# Altium PCB PCB_7000_0303_Rev13.PcbDoc (part 1 of 3)
Units mil, origin at the board's own origin, x right, y up, seen from the top; angles counter-clockwise.
Board outline 6252 x 3995 mil, 4 copper layers (Top Layer, Power, GND, Bottom Layer), stack 62.449 mil thick; 124 components, 105 nets, 610 pads, 262 vias.
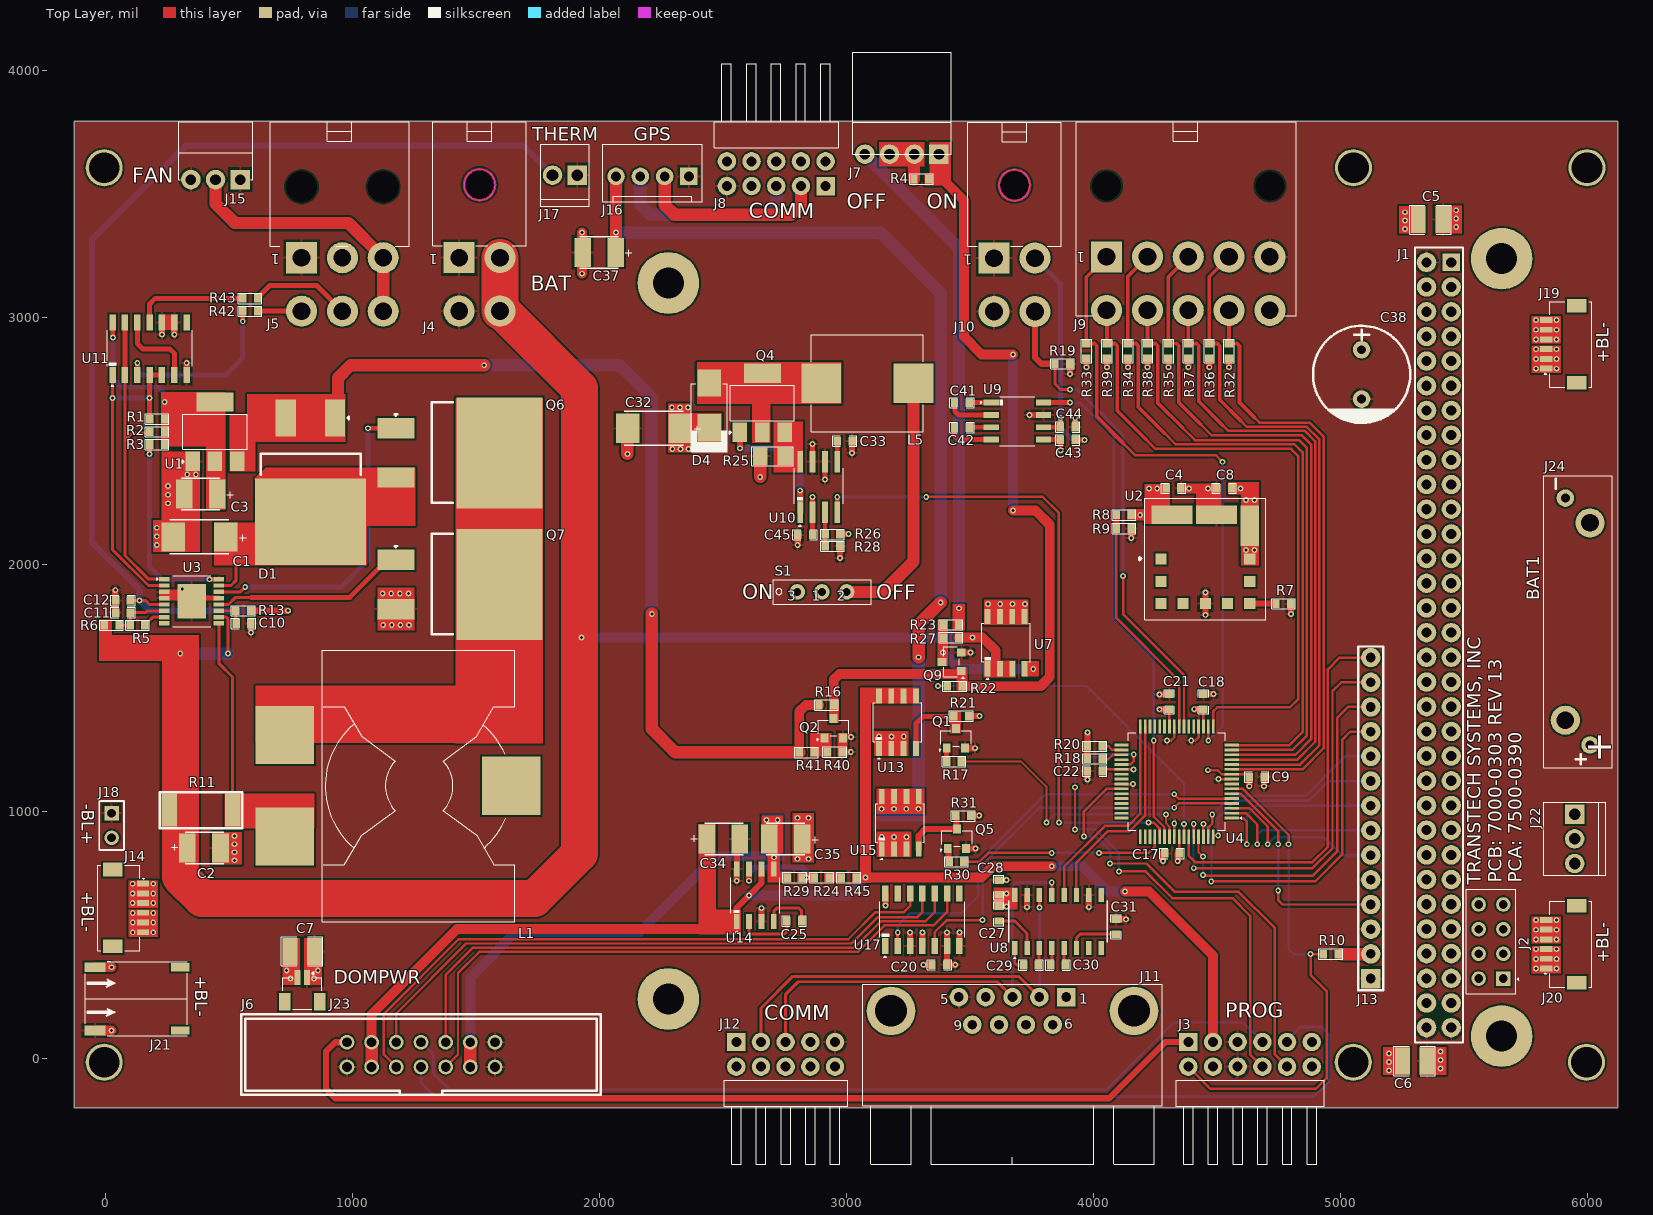
[diagram p0: Top Layer view]
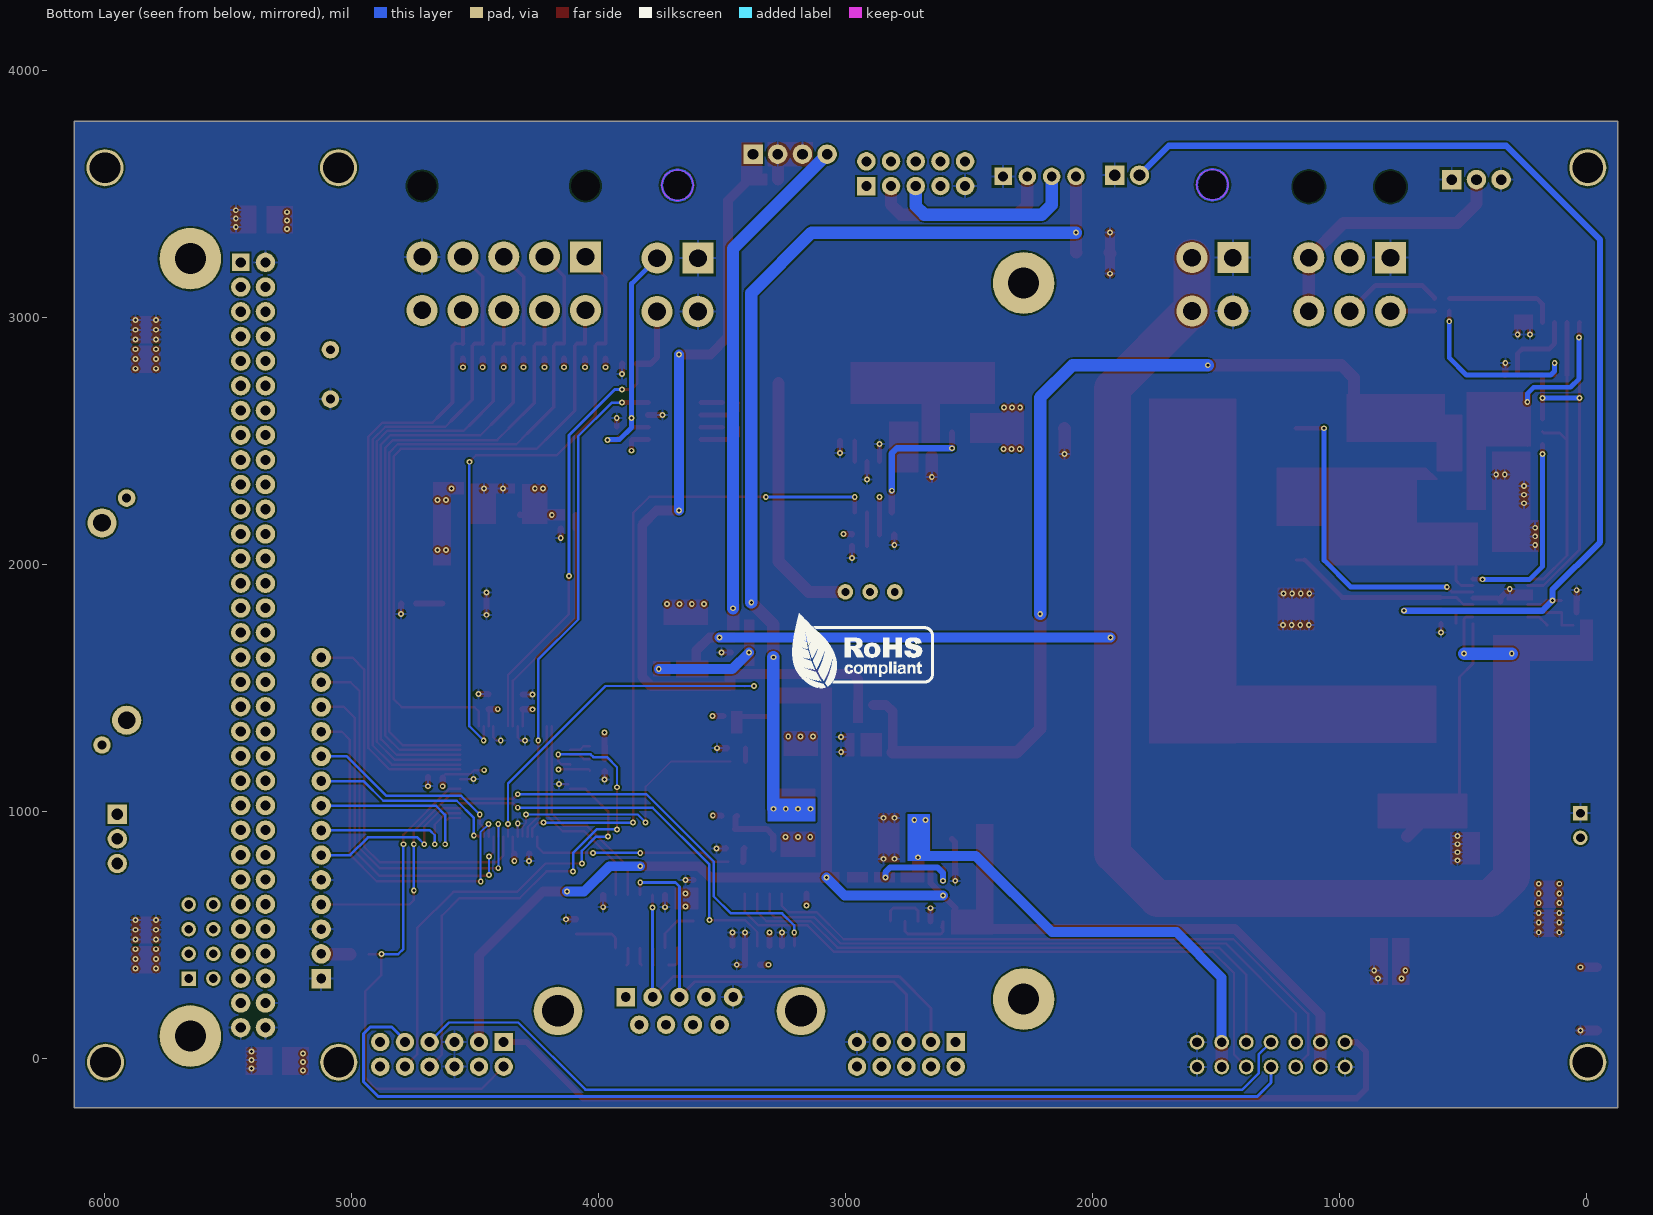
[diagram p1: Bottom Layer view, seen from below]
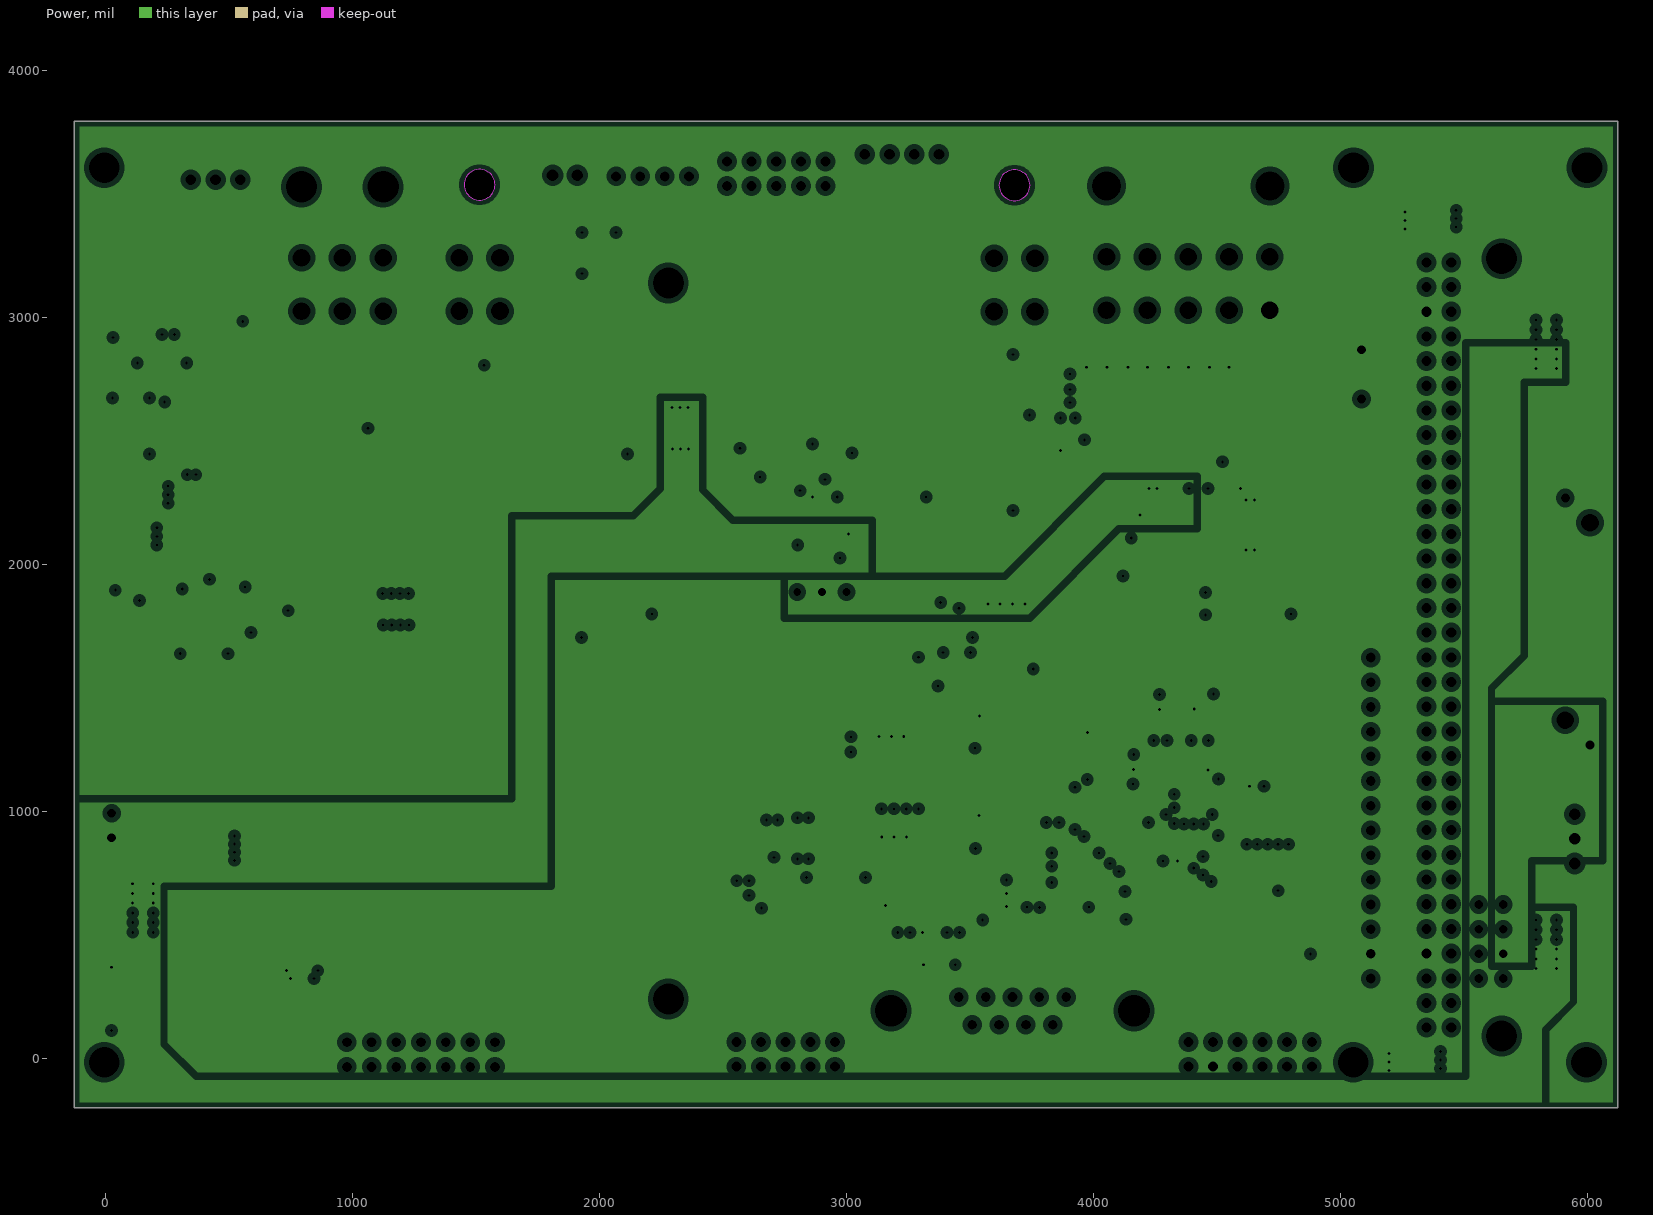
[diagram p2: Power, clearances drawn from the general rule]
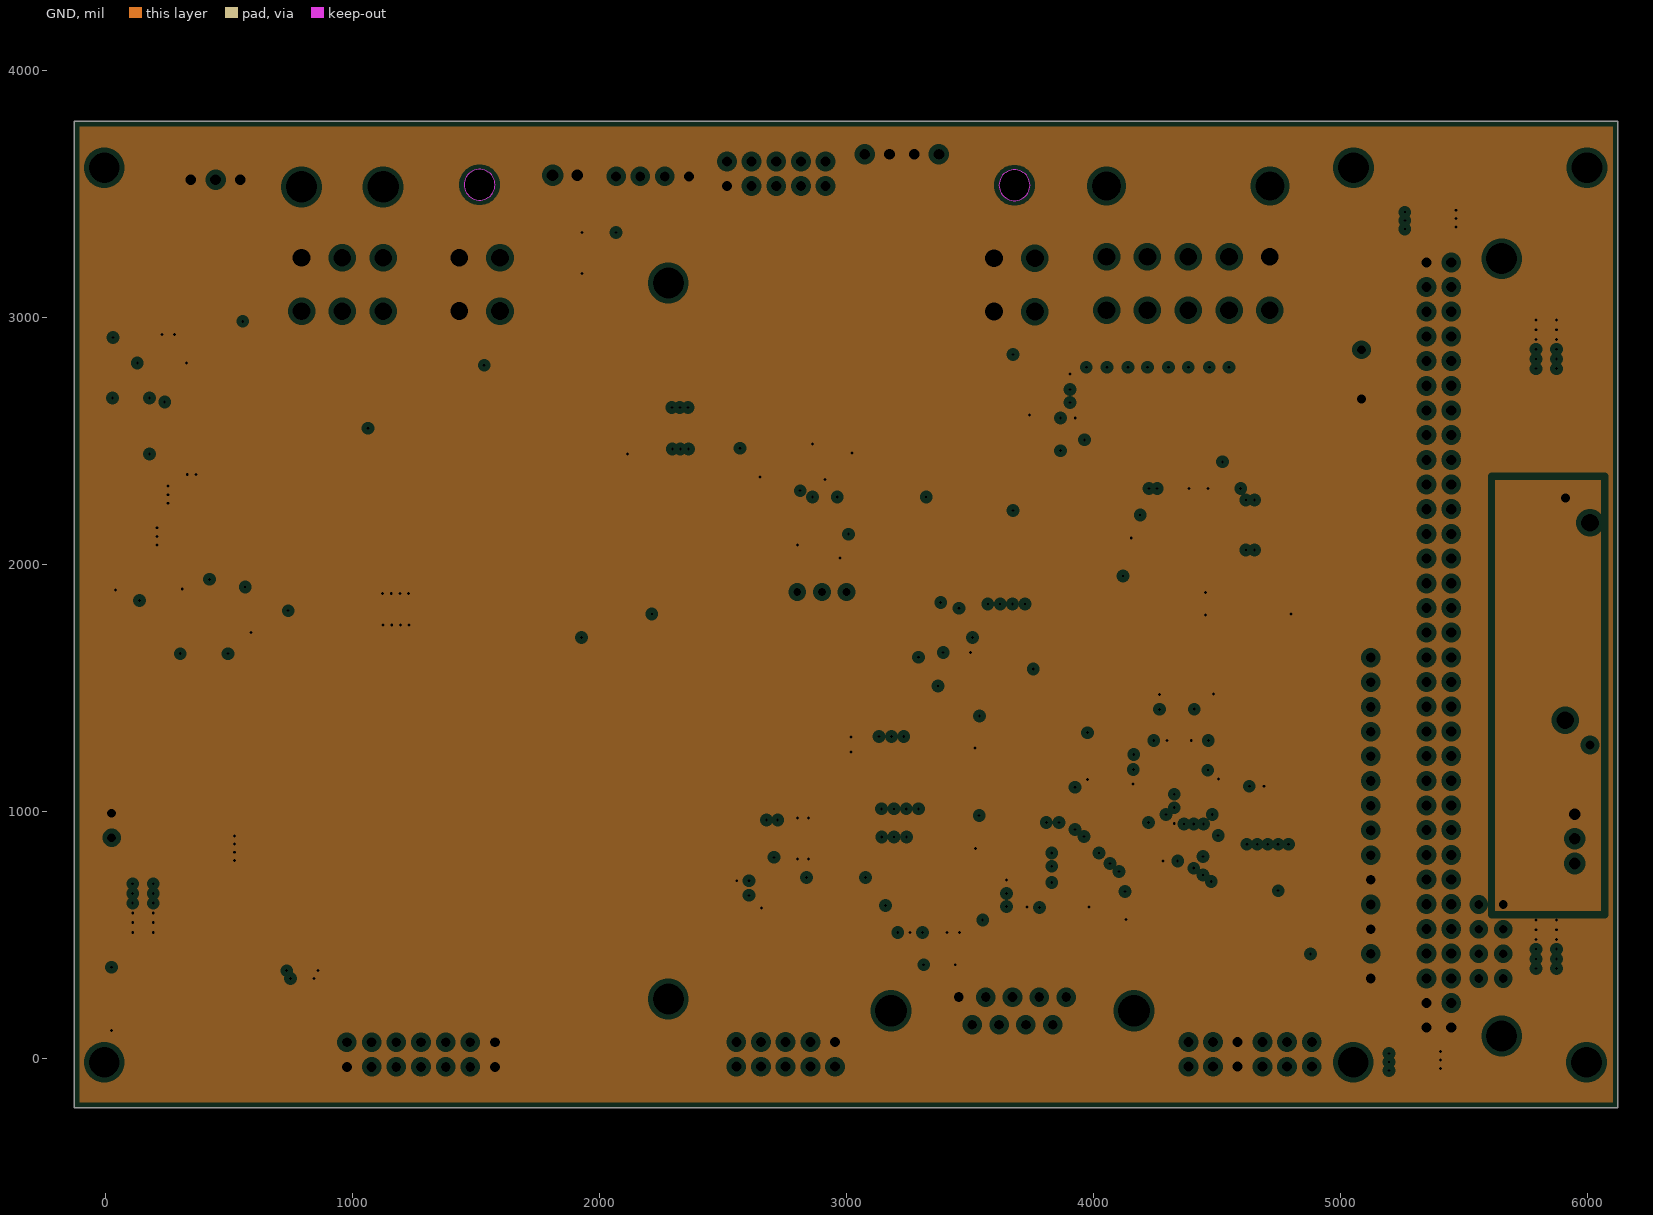
[diagram p3: GND, clearances drawn from the general rule]
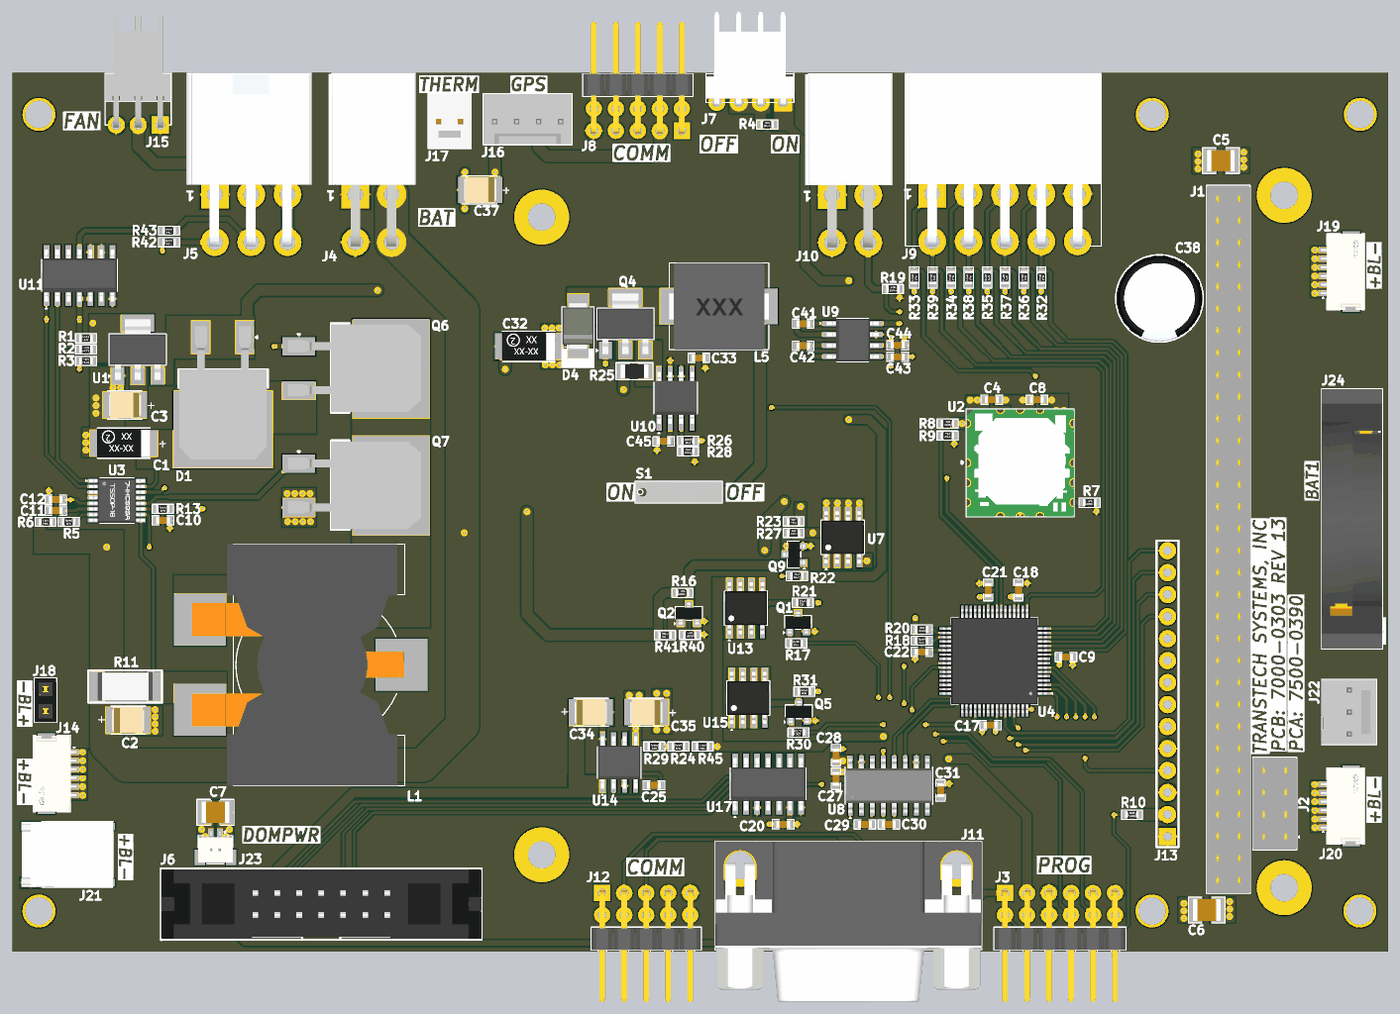
[diagram p5: 3D render of the assembled board from above, using the file's embedded part models]

## Layer stack, top to bottom
Top Solder: solder mask 0.3937, Solder Resist, Dk 3.5
Top Layer: signal copper 1.378
Dielectric 2: prepreg 8.2835, PP-006, Dk 4.1
Power: plane copper 0.5984, net (Multiple Nets)
Core: core 41.9291, FR-4, Dk 4.8
GND: plane copper 0.5984, net (Multiple Nets)
Dielectric 3: prepreg 8.2835, PP-006, Dk 4.1
Bottom Layer: signal copper 1.378
Bottom Solder: solder mask 0.3937, Solder Resist, Dk 3.5

## Board outline
-127,-200 -127,3795 6125,3795 6125,-200

## Design rules (kind name [scope] priority, off if disabled: settings)
Clearance [All] p1: gap=7 ignorepadtopadclearanceinfootprint=FALSE except(4: Arc-SMDPad Track-SMDPad SMDPad-SMDPad)
Height [All] p1: minheight=0 maxheight=10000 prefheight=500
HoleSize [All] p1: absolutevalues=TRUE maxlimit=1000 minlimit=1 maxpercent=80.000 minpercent=20.000
HoleToHoleClearance [All] p1: gap=0 allowstackedmicrovias=TRUE
MinimumSolderMaskSliver [All] p1: minsoldermaskwidth=0
PlaneClearance [All] p1: clearance=20
PlaneConnect [All] p1: planeconnectstyle=Direct reliefexpansion=20 reliefentries=4 reliefconductorwidth=10 reliefairgap=10
PolygonConnect [All] p1: connectstyle=Relief reliefconductorwidth=10 reliefentries=4 polygonreliefangle="90 Angle" airgapwidth=10
RoutingVias [All] p1: holewidth=11.81 width=23.62 viastyle="Through Hole" minholewidth=11.81 minwidth=23.62 maxholewidth=11.81 maxwidth=23.62
SilkToSilkClearance [All] p1: silktosilkclearance=0
SilkToSolderMaskClearance [IsPad] p1: minsilkscreentomaskgap=0 clearancetoexposedcopper=TRUE
SolderMaskExpansion [All] p1: expansion=4 istentingtop=FALSE
UnRoutedNet [All] p1: checkbadconnections=TRUE
Width [All] p1: maxlimit=150 minlimit=8 preferedwidth=15 minimp=50.000000 maximp=50.000000 favimp=50.000000
21 further rules are at their usual default settings.

## Classes and differential pairs
component class U_Power-Sheet: C1 C2 C3 C4 C8 C10 C11 C12 C25 C32 C33 C34 C35 C37 C41 C42 C43 C44 C45 D1 D4 J4 J7 J8 J10 J14 J16 J17 J18 J19 J20 J21 L1 L5 Q1 Q4 Q5 Q6 Q7 Q9 R4 R5 R6 R7 R8 R9 R11 R13 R17 R19 R21 R22 R23 R24 R25 R26 R27 R28 R29 R30 R31 R45 S1 U1 U2 U3 U7 U9 U10 U13 U14 U15
component class U_Controller-Sheet: C5 C6 C7 C9 C17 C18 C20 C21 C22 C27 C28 C29 C30 C31 C38 J1 J2 J3 J5 J6 J9 J11 J12 J13 J15 J22 J23 J24 Q2 R1 R2 R3 R10 R16 R18 R20 R32 R33 R34 R35 R36 R37 R38 R39 R40 R41 R42 R43 U4 U8 U11 U17

## Components (designator, comment, footprint, x,y, rotation, side; value= is the part's Value field where it differs from the comment)
C1 "22uF" Case-C 380,2112 r180 top locked
C2 "10uF" Case-B 398.07,852 r0 top locked
C3 "10uF" Case-B 385,2285 r180 top locked
C4 "4.7uF" Cap-0603 4325,2309 r180 top locked
C5 "100uF" Cap-1210 5366,3397 r0 top locked
C6 "100uF" Cap-1210 5302,-11 r0 top locked
C7 "100uF" Cap-1210 796,433 r180 top locked
C8 "4.7uF" Cap-0603 4530,2309 r0 top locked
C9 "0.1uF" Cap-0603 4662,1139 r180 top locked
C10 "0.1uF" Cap-0603 558,1761 r180 top locked
C11 "33nF" Cap-0603 70,1805 r180 top locked
C12 "68nF" Cap-0603 70,1855 r0 top locked
C17 "0.1uF" Cap-0603 4319,830 r0 top locked
C18 "0.1uF" Cap-0603 4446,1444 r270 top locked
C20 "0.1uF" Cap-0603 3377,379 r180 top locked
C21 "0.1uF" Cap-0603 4308,1444 r270 top locked
C22 "0.1uF" Cap-0603 4006,1163 r0 top locked
C25 "4.7uF" Cap-0603 2789,556 r0 top locked
C27 "0.1uF" Cap-0603 3617,586 r90 top locked
C28 "0.1uF" Cap-0603 3617,692 r270 top locked
C29 "0.1uF" Cap-0603 3748,378 r180 top locked
C30 "0.1uF" Cap-0603 3857,378 r0 top locked
C31 "0.1uF" Cap-0603 4092,533 r270 top locked
C32 "10uF" Case-C 2220.7,2552 r180 top locked
C33 "0.1uF" Cap-0603 2993,2500 r180 top locked
C34 "22uF" Case-B 2502,888 r0 top locked
C35 "22uF" Case-B 2755,888 r180 top locked
C37 "22uF" Case-B 1999,3264 r180 top
C38 "6ME3300WG" 6ME3300WG 5087,2770 r270 top locked
C41 "220nF" Cap-0603 3468,2655 r0 top locked
C42 "220nF" Cap-0603 3468,2555 r0 top locked
C43 "0.1uF" Cap-0603 3897,2505 r180 top locked
C44 "4.7uF" Cap-0603 3897,2557 r180 top locked
C45 "0.1uF" Cap-0603 2832.75,2120.32 r180 top locked
D1 "VS-48CTQ060S-M3" VS-48CTQ060S-M3 829,2384 r180 top locked
D4 "STPS340U" SMB_ 2444,2644.55 r270 top locked
J1 "ESW-132-12-G-D" ESW-132-12-G-D 5400,1674 r90 top locked
J2 "ESW-104-12-G-D" "HDR 2x4 Female Header" 5611,473 r90 top locked
J3 "CS-1107-2X6(L14/19)" "HDR 2x6TH (rigth angle)" 4635,16 r0 top locked
J4 "0039300040" 0039300040 1514.32,3134.73 r180 top locked
J5 "0039301060" 0039301060 958.64,3278.03 r180 top locked
J6 "2.54-2*7P" 2.54-2*7P 1277,15 r0 top locked
J7 "0022053041" 0022053041 3225,3662 r180 top locked
J8 "2541WR-2x05P" "HDR 2x5TH (rigth angle)" 2716,3583 r180 top locked
J9 "0039301100" 0039301100 4054,3246 r180 top locked
J10 "0039300040" 0039300040 3681,3132.73 r180 top locked
J11 "D-DMR009PF-D002" D-DMR009PF-D002 3672.88,191.99 r180 top locked
J12 "2541WR-2x05P" "HDR 2x5TH (rigth angle)" 2754,16 r0 top locked
J13 "DNP" "14P Through Hole Pads_" 5124,973 r90 top locked
J14 "SM06B-SHLS-TF(LF)(SN)" SM06B-SHLS-TF(LF)(SN) 89.48,609.06 r270 top locked
J15 "0022053031" 0022053031 445,3559 r180 top locked
J16 "M2510V-04P" M2510V-04P 2214.79,3572 r180 top locked
J17 "0022112022" 0022112022 1860,3577 r180 top locked
J18 "DM254R-11-02-85" "HDR1X2 (Female)" 24,943 r270 top locked
J19 "SM06B-SHLS-TF(LF)(SN)" SM06B-SHLS-TF(LF)(SN) 5896,2892 r90 top locked
J20 "SM06B-SHLS-TF(LF)(SN)" SM06B-SHLS-TF(LF)(SN) 5896,462 r90 top locked
J21 "SM02B-BHSS-1-TB(LF)(SN)" SM02B-BHSS-1-TB(LF)(SN) 129,241 r180 top locked
J22 "0022112032" 0022112032 5950,889 r270 top locked
J23 "BM02B-SRSS-TB(LF)(SN)" BM02B-SRSS-TB(LF)(SN) 796,278 r0 top locked
J24 "NH5077-LF" NH5077-LF 5962,1769 r90 top locked
L1 "THC2818-4R7M" THC2818-4R7M 1184,1104 r270 top locked
L5 "47uH" SMMS1050-470M 3085.01,2734 r0 top locked
Q1 "MMBT2222A-7-F" SOT-23 3444,1295.63 r0 top locked
Q2 "MMBT2222A-7-F" SOT-23 2948,1337 r0 top locked
Q4 "NTF3055L175T1G-VB" "SOT- 223" 2659.45,2655.08 r0 top locked
Q5 "MMBT2222A-7-F" SOT-23 3448,890 r0 top locked
Q6 "FQB27P06TM" D2Pak. 1385.04,2452 r270 top locked
Q7 "STB55NF06T4" STB55NF06T4 1385,1919 r270 top locked
Q9 "MMBT2222A-7-F" SOT-23 3426,1606 r90 top locked
R1 "10K" Res-0603 208,2589 r0 top locked value=10kR
R2 "10K" Res-0603 208,2538 r180 top locked value=10kR
R3 "10K" Res-0603 208,2486 r180 top locked value=10kR
R4 "1K" Res-0603 3304,3561 r180 top locked
R5 "10K" Res-0603 129,1754 r0 top locked value=10kR
R6 "49K9" Res-0603 24,1754 r0 top locked
R7 "1.3K" Res-0603 4770,1841 r180 top locked
R8 "10K" Res-0603 4124,2201 r180 top locked value=10kR
R9 "4.99K" Res-0603 4124,2146 r180 top locked
R10 "10K" Res-0603 4962,422 r180 top locked value=10kR
R11 "0.025R" RES-2512 386,1005 r0 top locked value=25mR
R13 "10K" Res-0603 557,1813 r0 top locked value=10kR
R16 "10K" Res-0603 2919,1431 r180 top locked value=10kR
R17 "1K" Res-0603 3436,1202 r0 top locked
R18 "1K" Res-0603 4006,1213.5 r0 top locked
R19 "1M" Res-0603 3875,2813 r180 top locked
R20 "1K" Res-0603 4006,1264 r180 top locked
R21 "10K" Res-0603 3465,1386 r0 top locked value=10kR
R22 "1K" Res-0603 3439,1507 r180 top locked
R23 "1K" Res-0603 3424,1756 r180 top locked
R24 "100K" Res-0603 2900.5,732 r0 top locked
R25 "40mR" Res-1206 2701,2439 r0 top locked
R26 "56K" Res-0603 2944,2122 r0 top locked
R27 "10K" Res-0603 3424,1704 r180 top locked value=10kR
R28 "10K" Res-0603 2944,2074 r180 top locked value=10kR
R29 "100K" Res-0603 2791,732 r0 top locked
R30 "1K" Res-0603 3446,796 r0 top locked
R31 "10K" Res-0603 3473,982 r0 top locked value=10kR
R32 "10K" Res-0603 4550,2865 r90 top locked value=10kR
R33 "10K" Res-0603 3972,2865 r90 top locked value=10kR
R34 "10K" Res-0603 4140.14,2865 r90 top locked value=10kR
R35 "10K" Res-0603 4304.29,2865 r90 top locked value=10kR
R36 "10K" Res-0603 4470,2865 r90 top locked value=10kR
R37 "10K" Res-0603 4385,2865 r90 top locked value=10kR
R38 "10K" Res-0603 4219.71,2865 r90 top locked value=10kR
R39 "10K" Res-0603 4055.57,2865 r90 top locked value=10kR
R40 "10K" Res-0603 2953,1240 r180 top locked value=10kR
R41 "10K" Res-0603 2839,1239 r0 top locked value=10kR
R42 "100R" Res-0603 585,3026 r0 top locked
R43 "100R" Res-0603 585,3078 r0 top locked
R45 "10K" Res-0603 3010,732 r0 top locked value=10kR
S1 "SM0320102" SM0320102 2901,1889 r0 top locked
U1 "LM1117S-5.0" "SOT- 223" 442.55,2538.08 r0 top locked
U2 "OKL-T/6-W12P-C" OKL-T/6-W12P-C 4454,2022 r0 top locked
U3 "LTC4010CFE#PBF" TSSOP-16-EP 348,1851 r0 top locked
U4 "PIC18F6627-I/PT" "64-TQFP (10x10)" 4338,1121 r180 top locked
U7 "FDS4435A" SOIC-8 3647,1684 r90 top locked
U8 "MAX232EIM/TR" SOP-16 3857,554.18 r90 top locked
U9 "MAX662AESA+T" "SOIC-8(0.154\", 3.90mm Width)" 3693,2581 r0 top locked
U10 "MAX1771ESA+" "SOIC-8(0.150\", 3.80mm Width)" 2888,2318 r90 top locked
U11 "MM74HC00M" SOIC-14 178,2874.3 r90 top locked
U13 "FDS4435A" SOIC-8 3207,1361 r90 top locked
U14 "MAX889RESA+" "SOIC-8(0.154\", 3.90mm Width)" 2631,660 r90 top locked
U15 "FDS4435A" SOIC-8 3218,953.3 r90 top locked
U17 "MAX3080ECSD+" SOIC-14 3308,561 r90 top locked

## Footprints (in the part's own frame and the unit in brackets; to place one, negate y for a bottom-side part, rotate by r counter-clockwise, add the part's x,y. Pads: shape width x height; smd on the part's side, far side on the other; paste and mask are expansions set on the pad)
2.54-2*7P [mil]
  round 60 hole 39.37 paste+0 mask+2: 1(-300,-50) 2(-300,50) 3(-200,-50) 4(-200,50) 5(-100,-50) 6(-100,50) 7(0,-50) 8(0,50) 9(100,-50) 10(100,50) 11(200,-50) 12(200,50) 13(300,-50) 14(300,50)
  silkscreen extent -728,-163 729,163, body extent -728,-156 729,158, height 1080
6ME3300WG [mm]
  round 1.8 hole 0.92 paste+0 mask+0.051: 1(-2.54,0) 2(2.54,0)
  silkscreen extent -5,-5 5.08,5, body extent -4.99,-5 5,5, height 15.91
"14P Through Hole Pads_" [mm]
  rect 2x2 hole 1: 1(-16.51,0)
  round 2 hole 1: 2(-13.97,0) 3(-11.43,0) 4(-8.89,0) 5(-6.35,0) 6(-3.81,0) 7(-1.27,0) 8(1.27,0) 9(3.81,0) 10(6.35,0) 11(8.89,0) 12(11.43,0) 13(13.97,0) 14(16.51,0)
  silkscreen extent -17.73,-1.27 17.65,1.27
"64-TQFP (10x10)" [mm]
  rect 1.47x0.28 smd: 1(-5.67,3.75) 2(-5.67,3.25) 3(-5.67,2.75) 4(-5.67,2.25) 5(-5.67,1.75) 6(-5.67,1.25) 7(-5.67,0.75) 8(-5.67,0.25) 9(-5.67,-0.25) 10(-5.67,-0.75) 11(-5.67,-1.25) 12(-5.67,-1.75) 13(-5.67,-2.25) 14(-5.67,-2.75) 15(-5.67,-3.25) 16(-5.67,-3.75) 33(5.67,-3.75) 34(5.67,-3.25) 35(5.67,-2.75) 36(5.67,-2.25) 37(5.67,-1.75) 38(5.67,-1.25) 39(5.67,-0.75) 40(5.67,-0.25) 41(5.67,0.25) 42(5.67,0.75) 43(5.67,1.25) 44(5.67,1.75) 45(5.67,2.25) 46(5.67,2.75) 47(5.67,3.25) 48(5.67,3.75)
  rect 0.28x1.47 smd: 17(-3.75,-5.67) 18(-3.25,-5.67) 19(-2.75,-5.67) 20(-2.25,-5.67) 21(-1.75,-5.67) 22(-1.25,-5.67) 23(-0.75,-5.67) 24(-0.25,-5.67) 25(0.25,-5.67) 26(0.75,-5.67) 27(1.25,-5.67) 28(1.75,-5.67) 29(2.25,-5.67) 30(2.75,-5.67) 31(3.25,-5.67) 32(3.75,-5.67) 49(3.75,5.67) 50(3.25,5.67) 51(2.75,5.67) 52(2.25,5.67) 53(1.75,5.67) 54(1.25,5.67) 55(0.75,5.67) 56(0.25,5.67) 57(-0.25,5.67) 58(-0.75,5.67) 59(-1.25,5.67) 60(-1.75,5.67) 61(-2.25,5.67) 62(-2.75,5.67) 63(-3.25,5.67) 64(-3.75,5.67)
  silkscreen extent -6.68,-5 5,5, body extent -5.99,-5.99 5.99,5.99, height 1.2
0022053031 [mm]
  rect 2x2 hole 1.1 paste+0 mask+0.051: 1(-2.54,0)
  round 2 hole 1.1 paste+0 mask+0.051: 2(0,0) 3(2.54,0)
  silkscreen extent -3.81,-5.97 3.81,0, body extent -3.73,-12.61 3.73,0.32, height 6.48
0022053041 [mm]
  rect 2x2 hole 1.1 paste+0 mask+0.051: 1(-3.81,0)
  round 2 hole 1.1 paste+0 mask+0.051: 2(-1.27,0) 3(1.27,0) 4(3.81,0)
  silkscreen extent -5.08,-10.5 5.08,0, body extent -5.08,-10.45 5.08,0.34, height 7.38
0022112022 [mm]
  rect 2x2 hole 1.2 paste+0 mask+0.051: 1(-1.27,0)
  round 2 hole 1.2 paste+0 mask+0.051: 2(1.27,0)
  silkscreen extent -2.5,-3.18 2.5,3.18, body extent -2.46,-3.18 2.46,3.17, height 10.73
0022112032 [mm]
  rect 2x2 hole 1.2 paste+0 mask+0.051: 1(-2.54,0)
  round 2 hole 1.2 paste+0 mask+0.051: 2(0,0) 3(2.54,0)
  silkscreen extent -3.77,-3.18 3.77,3.18, body extent -3.73,-3.25 3.73,3.1, height 10.68
0039300040 [mm]
  rect 3.2x3.2 hole 1.82: 1(2.1,-2.75)
  round 3.2 hole 1.82: 2(-2.1,-2.75) 3(2.1,2.75) 4(-2.1,2.75)
  Keep-Out Layer board cut-out: 1.6,-10.25 1.381,-9.456 0.796,-8.876 0,-8.664 -0.796,-8.876 -1.381,-9.456 -1.6,-10.25 -1.6,-10.25 -1.381,-11.044 -0.796,-11.624 0,-11.836 0.796,-11.624 1.381,-11.044 1.6,-10.25
  Multi-Layer circle w0.254: c0,-10.25 r1.6
  silkscreen extent -4.8,-16.75 4.8,-3.95, body extent -4.8,-16.67 5.2,3.27, height 13.1
0039301060 [mm]
  rect 3.2x3.2 hole 1.82: 1(4.2,0.9)
  round 3.2 hole 1.82: 2(0,0.9) 3(-4.2,0.9) 4(-4.2,6.4) 5(0,6.4) 6(4.2,6.4)
  round 0 hole 3.2 unplated: MH(-4.2,-6.4) MH(4.2,-6.4)
  silkscreen extent -6.9,-13.1 7.4,-0.3, body extent -6.85,-13.06 7.35,6.88, height 11.4
0039301100 [mm]
  rect 3.2x3.2 / inner round 3.2 / far side rect 3.2x3.2 hole 1.82 mask+0.076: 1(0,0)
  round 3.2 hole 1.82 mask+0.076: 2(-4.2,0) 3(-8.4,0) 4(-12.6,0) 5(-16.8,0) 6(0,5.5) 7(-4.2,5.5) 8(-8.4,5.5) 9(-12.6,5.5) 10(-16.8,5.5)
  round 0 hole 3 unplated mask+0.076: ""(-16.8,-7.3) ""(0,-7.3)
  silkscreen extent -19.5,-13.9 3.1,6.04, body extent -19.5,-13.9 3.1,6.03, height 11.4
BM02B-SRSS-TB(LF)(SN) [mm]
  rect 0.6x1.55 smd paste+0 mask+0.051: 1(0.502,1.25) 2(-0.498,1.25)
  rect 1.2x1.8 smd paste+0 mask+0.051: 3(1.8,-1.25) 4(-1.8,-1.25)
  silkscreen extent -2,-2 2,1.8, body extent -2,-1.86 2,1.74, height 4.3
Cap-0603 [mil]
  rect 30x35 smd mask+2.36: 1(-30,0) 2(30,0)
  silkscreen extent -49,-21 49,21, body extent -32,-16 31,16, height 34
Cap-1210 [mil] "SMD 1210"
  rect 60x110 smd: 1(-50,0) 2(50,0)
  silkscreen extent -84,-59 84,59, body extent -63,-49 63,49, height 39
Case-B [mm]
  rect 1.7x3 smd paste+0: 1(-1.7,0) 2(1.7,0)
  silkscreen extent -3.35,-1.63 2.03,1.63, body extent -1.85,-1.5 1.85,1.5, height 2.16
Case-C [mm]
  rect 2.4x3 smd: 1(-2.7,0) 2(2.7,0)
  silkscreen extent -4.8,-1.75 3.05,1.75, body extent -3.1,-1.67 3.1,1.68, height 2.46
D2Pak. [mm]
  rect 2.08x3.81 smd: 1(-2.54,-5.335) 2(2.54,-5.335)
  rect 11.43x8.89 smd: 3(0,5.335)
  silkscreen extent -5.21,-5.46 5.11,0.51, body extent -5.08,-6.6 5.02,8.79, height 4.5
D-DMR009PF-D002 [mm]
  rect 1.9x1.9 hole 1 paste+0 mask+0.051: 1(-5.52,-1.42)
  round 1.9 hole 1 paste+0 mask+0.051: 2(-2.76,-1.42) 3(0,-1.42) 4(2.76,-1.42) 5(5.52,-1.42) 6(-4.14,1.42) 7(-1.38,1.42) 8(1.38,1.42) 9(4.14,1.42)
  round 5 hole 3.25 paste+0 mask+0.051: 10(-12.5,0) 11(12.5,0)
  silkscreen extent -15.4,-2.75 15.4,15.75, body extent -15.45,-2.75 15.45,15.76, height 13.91
ESW-132-12-G-D [mm]
  rect 1.8x1.8 hole 1.04: 1(39.37,-1.27)
  round 2 hole 1.04: 2(39.37,1.27) 3(36.83,-1.27) 4(36.83,1.27) 5(34.29,-1.27) 6(34.29,1.27) 7(31.75,-1.27) 8(31.75,1.27) 9(29.21,-1.27) 10(29.21,1.27) 11(26.67,-1.27) 12(26.67,1.27) 13(24.13,-1.27) 14(24.13,1.27) 15(21.59,-1.27) 16(21.59,1.27) 17(19.05,-1.27) 18(19.05,1.27) 19(16.51,-1.27) 20(16.51,1.27) 21(13.97,-1.27) 22(13.97,1.27) 23(11.43,-1.27) 24(11.43,1.27) 25(8.89,-1.27) 26(8.89,1.27) 27(6.35,-1.27) 28(6.35,1.27) 29(3.81,-1.27) 30(3.81,1.27) 31(1.27,-1.27) 32(1.27,1.27) 33(-1.27,-1.27) 34(-1.27,1.27) 35(-3.81,-1.27) 36(-3.81,1.27) 37(-6.35,-1.27) 38(-6.35,1.27) 39(-8.89,-1.27) 40(-8.89,1.27) 41(-11.43,-1.27) 42(-11.43,1.27) 43(-13.97,-1.27) 44(-13.97,1.27) 45(-16.51,-1.27) 46(-16.51,1.27) 47(-19.05,-1.27) 48(-19.05,1.27) 49(-21.59,-1.27) 50(-21.59,1.27) 51(-24.13,-1.27) 52(-24.13,1.27) 53(-26.67,-1.27) 54(-26.67,1.27) 55(-29.21,-1.27) 56(-29.21,1.27) 57(-31.75,-1.27) 58(-31.75,1.27) 59(-34.29,-1.27) 60(-34.29,1.27) 61(-36.83,-1.27) 62(-36.83,1.27) 63(-39.37,-1.27) 64(-39.37,1.27)
  silkscreen extent -40.9,-2.47 40.9,2.47, body extent -40.89,-2.54 40.89,2.54, height 11.01
"HDR1X2 (Female)" [mm]
  rect 1.5x1.5 hole 0.9: 1(-1.27,0)
  round 1.5 hole 0.9: 2(1.27,0)
  silkscreen extent -2.54,-1.27 2.54,1.27, body extent -2.54,-1.27 2.54,1.27, height 8.8
"HDR 2x4 Female Header" [mm]
  rect 1.5x1.5 hole 0.9: 1(-3.81,-1.27)
  round 1.5 hole 0.9: 2(-3.81,1.27) 3(-1.27,-1.27) 4(-1.27,1.27) 5(1.27,-1.27) 6(1.27,1.27) 7(3.81,-1.27) 8(3.81,1.27)
  silkscreen extent -5.36,-2.84 5.36,2.54, body extent -5.33,-2.54 5.33,2.54, height 11.01
"HDR 2x5TH (rigth angle)" [mm]
  rect 1.9x1.9 hole 1.03 paste+0 mask+0.051: 1(-5.08,1.27)
  round 1.9 hole 1.03 paste+0 mask+0.051: 2(-5.08,-1.27) 3(-2.54,1.27) 4(-2.54,-1.27) 5(0,1.27) 6(0,-1.27) 7(2.54,1.27) 8(2.54,-1.27) 9(5.08,1.27) 10(5.08,-1.27)
  silkscreen extent -6.37,-11.33 6.37,-2.67, body extent -6.31,-11.33 6.3,1.57, height 5
"HDR 2x6TH (rigth angle)" [mm]
  rect 1.9x1.9 hole 1.03 paste+0 mask+0.051: 1(-6.35,1.27)
  round 1.9 hole 1.03 paste+0 mask+0.051: 2(-6.35,-1.27) 3(-3.81,1.27) 4(-3.81,-1.27) 5(-1.27,1.27) 6(-1.27,-1.27) 7(1.27,1.27) 8(1.27,-1.27) 9(3.81,1.27) 10(3.81,-1.27) 11(6.35,1.27) 12(6.35,-1.27)
  silkscreen extent -7.64,-11.33 7.64,-2.67, body extent -7.57,-11.31 7.58,1.59, height 5
M2510V-04P [mm]
  rect 1.8x1.8 hole 1: 1(-3.75,0)
  round 1.8 hole 1: 2(-1.25,0) 3(1.25,0) 4(3.75,0)
  silkscreen extent -5.13,-3.3 5.13,2.62, body extent -5.08,-3.25 5.08,2.55, height 11.7
NH5077-LF [mm]
  round 1.8 hole 0.92: 1(-12.7,-1.27) 2(12.7,1.27)
  round 3 hole 1.82: 3(-10.15,1.27) 3(10.15,-1.27)
  silkscreen extent -15.06,-3.56 15.01,3.51, body extent -15.03,-3.51 14.97,3.49, height 25.3
OKL-T/6-W12P-C [mil]
  rect 45x45 smd: 1(-180,0) 5(180,0) 6(180,-180) 7(0,-180) 8(-90,-180) 9(-180,-180) 10(-180,-90) 11(180,-90) 12(90,-180)
  rect 165x75 smd: 2(-135,180) 3(45,180)
  rect 75x165 smd: 4(180,135)
  silkscreen extent -266,-245 245,246, body extent -244,-244 244,244, height 286
Res-0603 [mil]
  rect 30x35 smd: 1(-30,0) 2(30,0)
  silkscreen extent -48,-21 48,21, body extent -31,-17 31,17, height 18
Res-1206 [mil]
  rect 60x70 smd: 1(-50,0) 2(50,0)
  silkscreen extent -84,-39 84,39, body extent -63,-31 63,31, height 24
RES-2512 [mm]
  rect 1.6x3.4 smd: 1(-3.25,0) 2(3.25,0)
  silkscreen extent -4.24,-1.85 4.24,1.85, body extent -3.17,-1.63 3.18,1.63, height 0.58
SM02B-BHSS-1-TB(LF)(SN) [mm]
  rect 2.2x1 smd paste+0 mask+0.05: 1(4.375,3.25) 2(4.375,-3.25)
  rect 1.9x0.85 smd paste+0 mask+0.05: 3(-4.375,-3.25) 4(-4.375,3.25)
  silkscreen extent -5.13,-3.8 5.37,3.8, body extent -5.1,-3.75 5.4,3.75, height 3.21
SM06B-SHLS-TF(LF)(SN) [mm]
  rect 0.6x1.25 smd paste+0 mask+0.051: 1(-2.5,1.561) 2(-1.5,1.561) 3(-0.5,1.561) 4(0.5,1.562) 5(1.5,1.562) 6(2.5,1.562)
  rect 1.4x2 smd paste+0 mask+0.051: MP1(-3.95,-1.562) MP2(3.95,-1.562)
  silkscreen extent -4.4,-3.11 4.4,1.76, body extent -4.4,-3.07 4.4,1.93, height 1.8
SM0320102 [mm]
  round 1.6 hole 0.82: 1(0,0) 2(2.54,0) 3(-2.54,0)
  silkscreen extent -5.03,-1.27 5.05,1.27, body extent -5,-1.22 5,1.22, height 1.4
SMB_ [mm]
  rect 2.8x2.4 smd: 1(-2.3,0) 2(2.3,0)
  silkscreen extent -2.21,-1.91 4.83,1.9, body extent -2.7,-1.8 2.7,1.8, height 2.3
SMMS1050-470M [mm]
  rect 4.1x4.1 smd: 1(-4.75,0) 2(4.75,0)
  silkscreen extent -5.75,-5 5.75,5, body extent -5.75,-5 5.75,5, height 4.9
SOIC-8 [mm]
  rect 1.55x0.6 smd: 1(-2.7,1.905) 2(-2.7,0.635) 3(-2.7,-0.635) 4(-2.7,-1.905) 5(2.7,-1.905) 6(2.7,-0.635) 7(2.7,0.635) 8(2.7,1.905)
  silkscreen extent -3.76,-2.49 1.99,2.49, body extent -3,-2.45 3,2.45, height 1.7
"SOIC-8(0.150\", 3.80mm Width)" [mm]
  rect 2.2x0.6 smd: 1(-2.7,1.905) 2(-2.7,0.635) 3(-2.7,-0.635) 4(-2.7,-1.905) 4(-2.7,-1.905) 5(2.5,-1.905) 6(2.5,-0.635) 7(2.5,0.635) 8(2.5,1.905)
  silkscreen extent -4.11,-2.51 1.8,2.51, body extent -3,-2.45 3,2.45, height 1.75
"SOIC-8(0.154\", 3.90mm Width)" [mm]
  rect 1.55x0.6 smd: 1(-2.7,1.905) 2(-2.7,0.635) 3(-2.7,-0.635) 4(-2.7,-1.905) 5(2.7,-1.905) 6(2.7,-0.635) 7(2.7,0.635) 8(2.7,1.905)
  silkscreen extent -3.79,-2.51 1.8,2.51, body extent -3.01,-2.45 3.01,2.45, height 1.63
SOIC-14 [mm]
  rect 1.62x0.67 smd: 1(-2.7,3.81) 2(-2.7,2.54) 3(-2.7,1.27) 4(-2.7,0) 5(-2.7,-1.27) 6(-2.7,-2.54) 7(-2.7,-3.81) 8(2.7,-3.81) 9(2.7,-2.54) 10(2.7,-1.27) 11(2.7,0) 12(2.7,1.27) 13(2.7,2.54) 14(2.7,3.81)
  silkscreen extent -3.84,-4.37 1.88,4.37, body extent -3.01,-4.33 3.01,4.33, height 1.75
SOP-16 [mil]
  rect 57.55x22 smd: 1(-107.27,175) 2(-107.27,125) 3(-107.27,75) 4(-107.27,25) 5(-107.27,-25) 6(-107.27,-75) 7(-107.27,-125) 8(-107.27,-175) 9(107.27,-175) 10(107.27,-125) 11(107.27,-75) 12(107.27,-25) 13(107.27,25) 14(107.27,75) 15(107.27,125) 16(107.27,175)
  silkscreen extent -149,-199 84,199, body extent -122,-197 122,197, height 69
SOT-23 [mm] "TRANS NPN 40V 0.6A SOT23"
  rect 0.82x0.92 smd: 1(-0.95,-1) 2(0.95,-1) 3(0,1)
  silkscreen extent -1.68,-1.3 1.55,0.81, body extent -1.5,-1.25 1.5,1.25, height 1.05
"SOT- 223" [mm]
  rect 1.5x2 smd: 1(-2.3,-3.05) 2(0,-3.05) 3(2.3,-3.05)
  rect 3.8x2 smd: 4(0,3.05)
  silkscreen extent -3.35,-3.2 3.3,1.8, body extent -3.25,-3.5 3.25,3.5, height 1.61
STB55NF06T4 [mm]
  rect 2.08x3.81 smd: 1(-2.54,-5.335) 3(2.54,-5.335)
  rect 11.43x8.89 smd: 2(0,5.335)
  silkscreen extent -5.21,-5.46 5.11,0.51, body extent -5.08,-6.6 5.02,8.79, height 4.5
THC2818-4R7M [mm]
  rect 6x6 smd paste+0 mask+0.051: 1(-5.215,-11.638) 2(5.215,-11.638) 3(0,11.638)
  silkscreen extent -13.96,-7.8 13.98,12.02, body extent -13.95,-12.54 13.95,11.96, height 15.4
TSSOP-16-EP [mm]
  rect 1.1x0.45 smd mask+0.05: 1(-2.8,2.275) 2(-2.8,1.625) 3(-2.8,0.975) 4(-2.8,0.325) 5(-2.8,-0.325) 6(-2.8,-0.975) 7(-2.8,-1.625) 8(-2.8,-2.275) 9(2.8,-2.275) 10(2.8,-1.625) 11(2.8,-0.975) 12(2.8,-0.325) 13(2.8,0.325) 14(2.8,0.975) 15(2.8,1.625) 16(2.8,2.275)
  rect 2.94x3.58 smd mask+0.05: 17(0,0)
  silkscreen extent -3.6,-2.61 1.98,2.61, body extent -3.2,-2.55 3.2,2.55, height 1.23
VS-48CTQ060S-M3 [mm]
  rect 2.08x3.81 smd: 1(-2.54,-5.335) 3(2.54,-5.335)
  rect 11.43x8.89 smd: 2(0,5.335)
  silkscreen extent -5.21,-5.46 5.11,0.51, body extent -5.08,-6.6 5.02,8.79, height 4.5

## Part data
C1: library part TR3C226K025C0250, "CAP TANT 22UF 10% 25V 2312", Manufacturer="Vishay Sprague", Supplier Part Number=74-TR3C226K025C0250, ComponentLink1Description=https://datasheet.ciiva.com/12911/tr3-239731-12911111.pdf?src-supplier=Mouser, ComponentLink1URL=https://datasheet.ciiva.com/12911/tr3-239731-12911111.pdf?src-supplier=Mouser, ComponentLink2Description=https://datasheet.ciiva.com/267/tr3-267103.pdf?src-supplier=Digikey, ComponentLink2URL=https://datasheet.ciiva.com/267/tr3-267103.pdf?src-supplier=Digikey, ComponentLink3Description=https://datasheet.ciiva.com/267/tr3-267104.pdf?src-supplier=Digikey, ComponentLink3URL=https://datasheet.ciiva.com/267/tr3-267104.pdf?src-supplier=Digikey, ComponentLink4Description=https://datasheet.ciiva.com/267/tr3-267105.pdf?src-supplier=Digikey, ComponentLink4URL=https://datasheet.ciiva.com/267/tr3-267105.pdf?src-supplier=Digikey, ComponentLink5Description=https://datasheet.ciiva.com/11299/tr3-11299414.pdf?src-supplier=Avnet, ComponentLink5URL=https://datasheet.ciiva.com/11299/tr3-11299414.pdf?src-supplier=Avnet, ComponentLink6Description=https://datasheet.ciiva.com/22731/1923401-22731838.pdf?src-supplier=Element14, ComponentLink6URL=https://datasheet.ciiva.com/22731/1923401-22731838.pdf?src-supplier=Element14, ComponentLink7Description=https://datasheet.ciiva.com/28445/1923401-28445770.pdf?src-supplier=Element14, ComponentLink7URL=https://datasheet.ciiva.com/28445/1923401-28445770.pdf?src-supplier=Element14, Item Type="Tantalum Capacitors", Manufacturer Part Number=TR3C226K025C0250, Pricing="1=1.45, 10=0.99, 50=0.99, 100=0.811, 1000=0.621, 10000=0.597 (USD)", RoHS=Yes, Stock=217, Supplier=Mouser
C2 C3: library part CA45-B025K106T, "10uF 25V 2.5Ω@100kHz ±10% CASE-B-3528 Tantalum Capacitors ROHS", LCSC Part Number=C119050, Manufacturer="Xiangyee in S&T", Package=Case-B, ComponentLink1Description=LCSC, ComponentLink1URL=https://www.lcsc.com/product-detail/Tantalum-Capacitors_Hunan-Xiangyee-in-S-T-CA45-B025K106T_C119050.html, Item Type=Capacitor, Manufacturer Part Number=CA45-B025K106T
C4 C8 C25 C44: library part C1608X5R1E475KT000E, "CAP CER, 4.7 µF, 25 V, 0603", Case Code (Imperial)=0603, Case Code (Metric)=1608, Dielectric=X5R, Dielectric Material=Ceramic, LCSC Part Number=C76615, Manufacturer=TDK, Max Operating Temperature=85°C, Min Operating Temperature=-55°C, Package Quantity=4000, Supplier Part Number 1=2220Y1000562GCT-ND, Tolerance=10%, Voltage Rating=25V, Capacitance=4.7uF, Case/Package=0603, Category="Ceramic Capacitors", ComponentLink1Description=https://datasheet.ciiva.com/48587/6print-detail-pdf-phplangenpart-noc1608x5r1e475k080acimp-unit-xmhz-48587141.pdf?src-supplier=Onlinecomponents.com, ComponentLink1URL=https://datasheet.ciiva.com/48587/6print-detail-pdf-phplangenpart-noc1608x5r1e475k080acimp-unit-xmhz-48587141.pdf?src-supplier=Onlinecomponents.com, ComponentLink2Description=https://datasheet.ciiva.com/24216/mlcc-commercial-general-en-24216326.pdf?src-supplier=Mouser, ComponentLink2URL=https://datasheet.ciiva.com/24216/mlcc-commercial-general-en-24216326.pdf?src-supplier=Mouser, ComponentLink3Description=https://datasheet.ciiva.com/48671/mlcc-commercial-general-en-48671304.pdf?src-supplier=Avnet, ComponentLink3URL=https://datasheet.ciiva.com/48671/mlcc-commercial-general-en-48671304.pdf?src-supplier=Avnet, Depth=0.8mm, Height=0.8mm, Item Type=Capacitor, Lead Free="Lead Free", Length=1.6mm, Manufacturer Part Number=C1608X5R1E475KT000E, Mount="Surface Mount", Packaging="Tape and Reel", Pricing 2="100=0.23400, 200=0.21900, 1000=0.20700, 2000=0.18700 (GBP)", REACH SVHC="No SVHC", Resistor Type=Ceramic, RoHS=No, Stock 2=16120, Supplier 1=Digi-Key, Supplier 2=RSComponents, Supplier Part Number 2=9159158P, Termination=SMD/SMT, Thickness=0.039inch, Voltage Rating (DC)=25V, Weight=7.1E-05oz, Width=0.031inch
C5 C6 C7: library part EMK325ABJ107MM-P, "CAP CER 100UF 16V X5R 1210", Case Code (Imperial)=1210, Case Code (Metric)=3225, LCSC Part Number=C90143, Manufacturer="Taiyo Yuden", Max Operating Temperature=85°C, Min Operating Temperature=-55°C, Supplier Part Number 1=587-5426-1-ND, Tolerance=20%, Voltage Rating=16V, Case/Package=1210, Category="Ceramic Capacitors", ComponentLink1Description=http://ds.yuden.co.jp/TYCOMPAS/ut/detail.do?productNo=EMK325ABJ107MM-P&fileName=EMK325ABJ107MM-P_SS&mode=specSheetDownload&src-supplier=Digi-Key, ComponentLink1URL=http://ds.yuden.co.jp/TYCOMPAS/ut/detail.do?productNo=EMK325ABJ107MM-P&fileName=EMK325ABJ107MM-P_SS&mode=specSheetDownload&src-supplier=Digi-Key, Item Type=Capacitor, Lead Free="Lead Free", Manufacturer Part Number=EMK325ABJ107MM-P, Mounting Technology="Surface Mount", Packaging="Cut Tape", Pricing 1="1=1.75, 10=1.415, 50=1.2352, 100=1.0809, 500=0.82352 (USD)", RoHS=Yes, RoHS Compliant=Yes, Series=M, Stock 1=81344, Supplier 1=Digi-Key
C9 C10 C17 C18 C20 C21 C22 C27 C28 C29 C30 C31 C33 C43 C45: library part CC0603KRX7R0BB104, "CAP CER 0.1UF 100V X7R 0603", Capacitance=100nF, Case Code (Imperial)=0603, Case Code (Metric)=1608, Dielectric=X7R, LCSC Part Number=C113803, Manufacturer=Yageo, Max Operating Temperature=125°C, Min Operating Temperature=-55°C, Package Quantity=4000, Resistor Type=Ceramic, Supplier Part Number 1=311-1523-1-ND, Tolerance=10%, Voltage Rating=100V, Case/Package=0603, Category="Ceramic Capacitors", ComponentLink1Description=https://datasheet.ciiva.com/6277/mlccorderingcode-6277030.pdf?src-supplier=Digi-Key, ComponentLink1URL=https://datasheet.ciiva.com/6277/mlccorderingcode-6277030.pdf?src-supplier=Digi-Key, ComponentLink2Description=https://datasheet.ciiva.com/6277/mlccorderingcode-6277081.pdf?src-supplier=Digi-Key, ComponentLink2URL=https://datasheet.ciiva.com/6277/mlccorderingcode-6277081.pdf?src-supplier=Digi-Key, ComponentLink3Description=https://datasheet.ciiva.com/6277/mlccorderingcode-6277082.pdf?src-supplier=Digi-Key, ComponentLink3URL=https://datasheet.ciiva.com/6277/mlccorderingcode-6277082.pdf?src-supplier=Digi-Key, Depth=0.8mm, Item Type=Capacitor, Lead Free="Lead Free", Length=0.063inch, Manufacturer Part Number=CC0603KRX7R0BB104, Mount="Surface Mount", Packaging="Tape and Reel", Pricing 1="1=0.19000, 10=0.13500, 50=0.07680, 100=0.06370, 500=0.04466, 1000=0.03696 (USD)", RoHS=Yes, RoHS Compliant=Yes, Series=CC, Stock 1=60476, Supplier 1=Digi-Key, Termination=SMD/SMT, Thickness=0.035inch, Voltage Rating (DC)=100V, Weight=7.1E-05oz, Width=0.031inch
C11: library part CL10B333KB8NNNC, "CAP CER 0.033UF 50V X7R 0603", Case Code (Imperial)=0603, Case Code (Metric)=1608, Dielectric=X7R, Manufacturer=Samsung, Max Operating Temperature=125°C, Min Operating Temperature=-55°C, Package Quantity=1, Tolerance=10%, Voltage=50V, Case/Package=0603, Category=Capacitors, ComponentLink1Description=https://datasheet.ciiva.com/15195/getdatasheetpartid-359558-15195751.pdf?src-supplier=Verical, ComponentLink1URL=https://datasheet.ciiva.com/15195/getdatasheetpartid-359558-15195751.pdf?src-supplier=Verical, ComponentLink2Description=https://datasheet.ciiva.com/29198/457066-da-01-en-vs-kondensator-0603-29198738.pdf?src-supplier=Conrad, ComponentLink2URL=https://datasheet.ciiva.com/29198/457066-da-01-en-vs-kondensator-0603-29198738.pdf?src-supplier=Conrad, ComponentLink3Description=https://datasheet.ciiva.com/16500/cl05b104kq5nnnc-16500696.pdf?src-supplier=Future+Electronics, ComponentLink3URL=https://datasheet.ciiva.com/16500/cl05b104kq5nnnc-16500696.pdf?src-supplier=Future+Electronics, ComponentLink4Description=https://datasheet.ciiva.com/26310/mlcc-catalogdownload2013-eng-26310287.pdf?src-supplier=Distrelec, ComponentLink4URL=https://datasheet.ciiva.com/26310/mlcc-catalogdownload2013-eng-26310287.pdf?src-supplier=Distrelec, Construction=Flat, Depth=0.8mm, Height=0.8mm, Length=1.6mm, Manufacturer Part Number=CL10B333KB8NNNC, Material=Ceramic, Mounting Technology="Surface Mount", Packaging="Tape and Reel", Pricing="4000=0.0055, 8000=0.00537, 16000=0.00525, 24000=0.00512, 32000=0.00499 (USD)", Radiation Hardening=No, RoHS=Yes, RoHS Compliant=Yes, Series=CL, Stock=128000, Supplier=Avnet, Supplier Part Number=CL10B333KB8NNNC, Thickness=0.035inch, Voltage Rating=50V, Voltage Rating (DC)=50V, Width=0.031inch
C12: library part CC0603KRX7R9BB683, "CAP CER 0.068UF 50V X7R 0603", Case Code (Imperial)=0603, Case Code (Metric)=1608, Dielectric=X7R, LCSC Part Number=C107098, Manufacturer=Yageo, Max Operating Temperature=125°C, Min Operating Temperature=-55°C, Supplier Part Number=3015344, Tolerance=10%, Voltage Rating=50V, Case/Package=0603, ComponentLink1Description=http://www.mouser.com/ds/2/447/Yageo_UPY-GP_NP0_16V-to-50V_9-358835.pdf?src-supplier=Mouser, ComponentLink1URL=http://www.mouser.com/ds/2/447/Yageo_UPY-GP_NP0_16V-to-50V_9-358835.pdf?src-supplier=Mouser, ComponentLink2Description=https://datasheet.octopart.com/CC0603KRX7R9BB683-Yageo-datasheet-166511530.pdf?src-supplier=Future+Electronics, ComponentLink2URL=https://datasheet.octopart.com/CC0603KRX7R9BB683-Yageo-datasheet-166511530.pdf?src-supplier=Future+Electronics, ComponentLink3Description=http://www.yageo.com/documents/recent/UPY-GPHC_X7R_6.3V-to-50V_18.pdf?src-supplier=Digikey, ComponentLink3URL=http://www.yageo.com/documents/recent/UPY-GPHC_X7R_6.3V-to-50V_18.pdf?src-supplier=Digikey, ComponentLink4Description=https://www.yageo.com/upload/media/product/productsearch/datasheet/mlcc/UPY-GPHC_X7R_6.3V-to-50V_18.pdf?src-supplier=Digikey, ComponentLink4URL=https://www.yageo.com/upload/media/product/productsearch/datasheet/mlcc/UPY-GPHC_X7R_6.3V-to-50V_18.pdf?src-supplier=Digikey, ComponentLink5Description=https://datasheet.octopart.com/CC0603KRX7R9BB683-Yageo-datasheet-140260305.pdf?src-supplier=Newark, ComponentLink5URL=https://datasheet.octopart.com/CC0603KRX7R9BB683-Yageo-datasheet-140260305.pdf?src-supplier=Newark, ComponentLink6Description=http://www.yageo.com/documents/recent/UPY-GPHC_X7R_6.3V-to-50V_9.pdf?src-supplier=Future+Electronics, ComponentLink6URL=http://www.yageo.com/documents/recent/UPY-GPHC_X7R_6.3V-to-50V_9.pdf?src-supplier=Future+Electronics, Halogen Free="Halogen Free", Item Type=Capacitors, Lead Free="Lead Free", Length=0.063inch, Manufacturer Part Number=CC0603KRX7R9BB683, Material=4241ConductorMaterial, Mounting Technology="Surface Mount", Packaging="Tape and Reel", Pricing="4000=0.0058, 16000=0.0055, 60000=0.0052, 160000=0.005, 400000=0.0047 (USD)", RoHS=Yes, RoHS Compliant=Yes, Series=CC, Stock=52000, Supplier="Future Electronics", Termination=SMD/SMT, Thickness=0.035inch, Voltage Rating (DC)=50V, Weight=7.1E-05oz, Width=0.031inch
C32: library part TAJC106K035RNJ, "CAP TANT 10UF 10% 35V 2312", Case Code (Imperial)=2312, Case Code (Metric)=6032, Case/Package=Molded, Dielectric Material=Tantalum, ESR (Equivalent Series Resistance)=1.6R, LCSC Part Number=C7211, Leakage Current=3.5uA, Manufacturer="Kyocera AVX", Max Operating Temperature=125°C, Min Operating Temperature=-55°C, Package Quantity=500, Ripple Current=262mA, Tolerance=20%, Voltage=25V, Voltage Rating=35V, ComponentLink1Description=https://datasheet.ciiva.com/11793/0900766b80ccdc61-11793205.pdf?src-supplier=Rs, ComponentLink1URL=https://datasheet.ciiva.com/11793/0900766b80ccdc61-11793205.pdf?src-supplier=Rs, ComponentLink2Description=https://datasheet.ciiva.com/26341/559442-da-01-en-tacc-c-6-0-mm-x-3-2-mm-x-2-6-mm-10-uf-26341782.pdf?src-supplier=Conrad, ComponentLink2URL=https://datasheet.ciiva.com/26341/559442-da-01-en-tacc-c-6-0-mm-x-3-2-mm-x-2-6-mm-10-uf-26341782.pdf?src-supplier=Conrad, ComponentLink3Description=https://datasheet.ciiva.com/5937/taj-5937099.pdf?src-supplier=Farnell, ComponentLink3URL=https://datasheet.ciiva.com/5937/taj-5937099.pdf?src-supplier=Farnell, ComponentLink4Description=https://datasheet.ciiva.com/7730/taj-7730983.pdf?src-supplier=Element14, ComponentLink4URL=https://datasheet.ciiva.com/7730/taj-7730983.pdf?src-supplier=Element14, ComponentLink5Description=https://datasheet.ciiva.com/7730/1703059-7730751.pdf?src-supplier=Element14, ComponentLink5URL=https://datasheet.ciiva.com/7730/1703059-7730751.pdf?src-supplier=Element14, ComponentLink6Description=https://datasheet.ciiva.com/7730/1703059-7730750.pdf?src-supplier=Element14, ComponentLink6URL=https://datasheet.ciiva.com/7730/1703059-7730750.pdf?src-supplier=Element14, ComponentLink7Description=https://datasheet.ciiva.com/7730/1680476-7730748.pdf?src-supplier=Element14, ComponentLink7URL=https://datasheet.ciiva.com/7730/1680476-7730748.pdf?src-supplier=Element14, ComponentLink8Description=https://datasheet.ciiva.com/7730/13070-7730749.pdf?src-supplier=Element14, ComponentLink8URL=https://datasheet.ciiva.com/7730/13070-7730749.pdf?src-supplier=Element14, ComponentLink9Description=https://datasheet.ciiva.com/264/taj-264350.pdf?src-supplier=Digikey, ComponentLink9URL=https://datasheet.ciiva.com/264/taj-264350.pdf?src-supplier=Digikey, ComponentLink10Description=https://datasheet.ciiva.com/264/taj-264349.pdf?src-supplier=Digikey, ComponentLink10URL=https://datasheet.ciiva.com/264/taj-264349.pdf?src-supplier=Digikey, ComponentLink11Description=https://datasheet.ciiva.com/264/taj-264351.pdf?src-supplier=Digikey, ComponentLink11URL=https://datasheet.ciiva.com/264/taj-264351.pdf?src-supplier=Digikey, ComponentLink12Description=https://datasheet.ciiva.com/12911/taj-27497-12911561.pdf?src-supplier=Mouser, ComponentLink12URL=https://datasheet.ciiva.com/12911/taj-27497-12911561.pdf?src-supplier=Mouser, ComponentLink13Description=https://datasheet.ciiva.com/14590/70001050-14590313.pdf?src-supplier=Allied+Electronics, ComponentLink13URL=https://datasheet.ciiva.com/14590/70001050-14590313.pdf?src-supplier=Allied+Electronics, ComponentLink14Description=https://datasheet.ciiva.com/3004/taj-3004476.pdf?src-supplier=Avnet, ComponentLink14URL=https://datasheet.ciiva.com/3004/taj-3004476.pdf?src-supplier=Avnet, ComponentLink15Description=https://datasheet.ciiva.com/15163/getdatasheetpartid-110753-15163367.pdf?src-supplier=Verical, ComponentLink15URL=https://datasheet.ciiva.com/15163/getdatasheetpartid-110753-15163367.pdf?src-supplier=Verical, ComponentLink16Description=https://datasheet.ciiva.com/3004/taj-3004475.pdf?src-supplier=Avnet, ComponentLink16URL=https://datasheet.ciiva.com/3004/taj-3004475.pdf?src-supplier=Avnet, Construction=Flat, Depth=3.2mm, Dissipation Factor=6%, Features="General Purpose", Height=2.6mm, Item Type="Tantalum Capacitors", Lead Free="Lead Free", Length=6mm, Life (Hours)=2000Hour, Manufacturer Part Number=TAJC106K035RNJ, Mounting Technology="Surface Mount,PCB", Packaging="Tape and Reel", Pins=2, Polarity=Polar, Pricing="500=0.4611, 1000=0.4505, 2000=0.4399, 3000=0.4293, 4000=0.4187, 5000=0.4081, 50000=0.4028 (USD)", Radiation Hardening=No, Reach SVHC Compliant=No, RoHS=Yes, RoHS Compliant=Yes, Series=TAJ, Stock=20000, Supplier=Avnet, Supplier Part Number=TAJC106K035RNJ, Termination=SMD/SMT, Voltage Rating (DC)=35V, Width=3.2mm
C34 C35 C37: library part TAJB226K016RNJ, "CAP TANT 22UF 10% 16V 1411", LCSC Part Number=C8020, Manufacturer="Kyocera AVX", Package=CASE-B-3528, ComponentLink1Description=LCSC, ComponentLink1URL=https://www.lcsc.com/product-detail/Tantalum-Capacitors_Kyocera-AVX-TAJB226K016RNJ_C8020.html, Item Type="Tantalum Capacitor", Manufacturer Part Number=TAJB226K016RNJ
C38: "3300uF 6.3V ±20% Plugin,D10xL23mm Aluminum Electrolytic Capacitors - Leaded ROHS", LCSC Part Number=C242095, Manufacturer="SUNCON(SUN Elec Industries)", Package=Plugin,D10xL23mm, ComponentLink1Description=LCSC, ComponentLink1URL=https://www.lcsc.com/product-detail/Aluminum-Electrolytic-Capacitors-Leaded_SUNCON-SUN-Elec-Industries-6ME3300WG_C242095.html, Item Type=Capacitors, Manufacturer Part Number=6ME3300WG
C41 C42: library part CC0603KRX7R6BB224, "CAP CER 0.22UF 10V X7R 0603", LCSC Part Number=C106216, Manufacturer=Yageo, Supplier Part Number=4740247, Category="Ceramic Capacitors", ComponentLink1Description=https://datasheet.ciiva.com/11786/0900766b80ce67ed-11786433.pdf?src-supplier=Rs, ComponentLink1URL=https://datasheet.ciiva.com/11786/0900766b80ce67ed-11786433.pdf?src-supplier=Rs, ComponentLink2Description=https://datasheet.ciiva.com/15189/getdatasheetpartid-93657-15189159.pdf?src-supplier=Verical, ComponentLink2URL=https://datasheet.ciiva.com/15189/getdatasheetpartid-93657-15189159.pdf?src-supplier=Verical, ComponentLink3Description=https://datasheet.ciiva.com/144/mlccorderingcode-144664.pdf?src-supplier=Digi-Key, ComponentLink3URL=https://datasheet.ciiva.com/144/mlccorderingcode-144664.pdf?src-supplier=Digi-Key, ComponentLink4Description=https://datasheet.ciiva.com/144/mlccorderingcode-144665.pdf?src-supplier=Digi-Key, ComponentLink4URL=https://datasheet.ciiva.com/144/mlccorderingcode-144665.pdf?src-supplier=Digi-Key, ComponentLink5Description=https://datasheet.ciiva.com/144/mlccorderingcode-144666.pdf?src-supplier=Digi-Key, ComponentLink5URL=https://datasheet.ciiva.com/144/mlccorderingcode-144666.pdf?src-supplier=Digi-Key, ComponentLink6Description=https://datasheet.ciiva.com/8033/1489800-8033791.pdf?src-supplier=Element14, ComponentLink6URL=https://datasheet.ciiva.com/8033/1489800-8033791.pdf?src-supplier=Element14, ComponentLink7Description=https://datasheet.ciiva.com/7978/1489800-7978173.pdf?src-supplier=Element14, ComponentLink7URL=https://datasheet.ciiva.com/7978/1489800-7978173.pdf?src-supplier=Element14, ComponentLink8Description=https://datasheet.ciiva.com/11464/upy-gphc-x7r-6-3v-to-50v-8-11464734.pdf?src-supplier=Avnet, ComponentLink8URL=https://datasheet.ciiva.com/11464/upy-gphc-x7r-6-3v-to-50v-8-11464734.pdf?src-supplier=Avnet, Item Type=Capacitor, Manufacturer Part Number=CC0603KRX7R6BB224, Pricing="4000=0.0074, 16000=0.0071, 60000=0.0067, 100000=0.0066, 200000=0.0062 (USD)", RoHS=Yes, Stock=892000, Supplier="Future Electronics"
D1: "DIODE ARR SCHOTT 60V 20A TO263AB", Average Rectified Current=20A, Case/Package=TO-263-3, Manufacturer="Vishay Semiconductors", Max Reverse Voltage (DC)=60V, Supplier Part Number=78-VS-48CTQ060S-M3, ComponentLink1Description=http://www.vishay.com/docs/94944/vs-48ctq060s-m3.pdf?src-supplier=Digikey, ComponentLink1URL=http://www.vishay.com/docs/94944/vs-48ctq060s-m3.pdf?src-supplier=Digikey, Item Type="Rectifier Diodes", Manufacturer Part Number=VS-48CTQ060S-M3, Mounting Technology="Surface Mount", Packaging=Rail/Tube, Pricing="1=2.03, 10=1.62, 50=1.62, 100=1.35, 1000=0.906, 10000=0.869 (USD)", RoHS=Yes, RoHS Compliant=Yes, Series=-, Stock=5641, Supplier=Mouser
D4: "40V 3A 570mV SMB Schottky Barrier Diodes (SBD) ROHS", LCSC Part Number=C5377821, Manufacturer=Tokmas, Package=SMB, ComponentLink1Description=LCSC, ComponentLink1URL=https://www.lcsc.com/product-detail/Schottky-Barrier-Diodes-SBD_Tokmas-STPS340U_C5377821.html, Item Type=Diode, Manufacturer Part Number=STPS340U
J1: "CONN SOCKET 64POS 0.1 GOLD PCB", Color=Black, Contact Resistance=10mR, Flammability Rating="UL94 V-0", Manufacturer=Samtec, Max Current Rating=6.9A, Max Operating Temperature=125°C, Max Voltage Rating (AC)=550V, Min Operating Temperature=-55°C, Package Quantity=1, Supplier Part Number=SAM10471-ND, ComponentLink1Description=https://datasheet.ciiva.com/756/esw-1xx-xx-x-x-xx-xx-mkt-756084.pdf?src-supplier=Digikey, ComponentLink1URL=https://datasheet.ciiva.com/756/esw-1xx-xx-x-x-xx-xx-mkt-756084.pdf?src-supplier=Digikey, Connector Type=Receptacle, Contact Finish - Mating=GOLD, Contact Material=Bronze, Contact Plating=Gold, Contact Shape=Square, Contact Type="Female Socket", Depth=4.95mm, Fastening Type=Pull, Gender=Receptacle, Housing Color=Black, Housing Material=Polyester, Insulation Color=Black, Insulation Material=Polymer, Item Type=Connectors, Length=81.79mm, Manufacturer Part Number=ESW-132-12-G-D, Mounting Technology="Through Hole", Number of Contacts=64, Number of Positions=64, Number of Rows=2, Orientation=Straight, Packaging=Rail/Tube, Pitch=2.54mm, Pricing="1=14.7, 10=12.736, 100=10.4968, 500=9.58712, 1000=9.228 (USD)", RoHS=Yes, RoHS Compliant=Yes, Row Spacing=0.1inch, Series=ESW, Stock=450, Supplier=Digikey, Termination=Solder, Voltage Rating (AC)=550V
J2: "Battery Holder Vertical", Color=Black, Contact Resistance=10mR, Flammability Rating="UL94 V-0", Manufacturer=Samtec, Max Current Rating=6.9A, Max Operating Temperature=125°C, Max Voltage Rating (AC)=550V, Min Operating Temperature=-55°C, Package Quantity=1, Supplier Part Number=SAM10466-ND, Category=Connectors, ComponentLink1Description=https://datasheet.ciiva.com/756/esw-1xx-xx-x-x-xx-xx-mkt-756054.pdf?src-supplier=Digikey, ComponentLink1URL=https://datasheet.ciiva.com/756/esw-1xx-xx-x-x-xx-xx-mkt-756054.pdf?src-supplier=Digikey, ComponentLink2Description=https://datasheet.ciiva.com/16990/nh5077-lf-16990158.pdf?src-supplier=Future+Electronics, ComponentLink2URL=https://datasheet.ciiva.com/16990/nh5077-lf-16990158.pdf?src-supplier=Future+Electronics, ComponentLink3Description=https://datasheet.ciiva.com/1391/35241-1391061.pdf?src-supplier=Element14, ComponentLink3URL=https://datasheet.ciiva.com/1391/35241-1391061.pdf?src-supplier=Element14, ComponentLink4Description=https://datasheet.ciiva.com/12342/nh5077-lf-29240-12342970.pdf?src-supplier=Mouser, ComponentLink4URL=https://datasheet.ciiva.com/12342/nh5077-lf-29240-12342970.pdf?src-supplier=Mouser, Connector Type=Receptacle, Contact Finish - Mating=GOLD, Contact Material=Bronze, Contact Plating=Gold, Contact Shape=Square, Contact Type="Female Socket", Depth=4.95mm, Fastening Type=Pull, Gender=Female, Housing Color=Black, Housing Material=Polyester, Insulation Color=Black, Insulation Material=Polymer, Item Type="Female Header", Length=10.67mm, Manufacturer Part Number=ESW-104-12-G-D, Mounting Technology="Through Hole", Number of Contacts=8, Number of Positions=8, Number of Rows=2, Orientation=Vertical, Packaging=Rail/Tube, Pitch=2.54mm, Pricing="1=3.41, 10=3.095, 100=2.727, 500=2.31796, 1000=1.97708, 5000=1.77255 (USD)", Radiation Hardening=No, RoHS=Yes, RoHS Compliant=Yes, Row Spacing=0.1inch, Series=ESW, Stock=332, Supplier=Digikey, Termination=Solder, Voltage Rating (AC)=550V
J3: "250V 3A Right-Angle Square Pins 2.54mm 12P 6mm -40℃~+105℃ 2.54mm 双排 Black 2x6P 2.54mm Push-Pull,P=2.54mm Pin Headers ROHS", LCSC Part Number=C2911299, Manufacturer=CST, Package=Push-Pull,P=2.54mm, ComponentLink1Description=LCSC, ComponentLink1URL=https://www.lcsc.com/product-detail/Pin-Headers_CST-CS-1107-2X6-L14-19_C2911299.html, Item Type="Pin Header", Manufacturer Part Number=CS-1107-2X6(L14/19)
J4 J10: "CONN HEADER R/A 4POS 4.2MM", LCSC Part Number=C234187, Manufacturer=Molex, Manufacturer Part Number=39-30-0040, Supplier Part Number=538-39-30-0040, ComponentLink1Description=https://datasheet.ciiva.com/5149/0039300040-pcb-headers-140142-5149121.pdf?src-supplier=Mouser, ComponentLink1URL=https://datasheet.ciiva.com/5149/0039300040-pcb-headers-140142-5149121.pdf?src-supplier=Mouser, ComponentLink2Description=https://datasheet.ciiva.com/11753/0900766b80d5d5b2-11753001.pdf?src-supplier=Rs, ComponentLink2URL=https://datasheet.ciiva.com/11753/0900766b80d5d5b2-11753001.pdf?src-supplier=Rs, ComponentLink3Description=https://datasheet.ciiva.com/26921/getdatasheetpartid-168591-26921980.pdf?src-supplier=Verical, ComponentLink3URL=https://datasheet.ciiva.com/26921/getdatasheetpartid-168591-26921980.pdf?src-supplier=Verical, ComponentLink4Description=https://datasheet.ciiva.com/30077/32250039300040-pcb-headers-30077452.pdf?src-supplier=Onlinecomponents.com, ComponentLink4URL=https://datasheet.ciiva.com/30077/32250039300040-pcb-headers-30077452.pdf?src-supplier=Onlinecomponents.com, ComponentLink5Description=https://datasheet.ciiva.com/17018/70266946-17018007.pdf?src-supplier=Allied+Electronics, ComponentLink5URL=https://datasheet.ciiva.com/17018/70266946-17018007.pdf?src-supplier=Allied+Electronics, ComponentLink6Description=https://datasheet.ciiva.com/1443/1707493-1443179.pdf?src-supplier=Element14, ComponentLink6URL=https://datasheet.ciiva.com/1443/1707493-1443179.pdf?src-supplier=Element14, Item Type="Headers and Wire Housings", Pricing="1=0.89, 10=0.754, 50=0.754, 100=0.681, 1000=0.608, 10000=0.53 (USD)", RoHS=Yes, Stock=15606, Supplier=Mouser
J5: "CONN HEADER R/A 6POS 4.2MM", Manufacturer=Molex, Supplier Part Number=538-39-30-1060, Item Type="Headers, Male Pins", Manufacturer Part Number=0039301060, Pricing="1=1.12, 10=0.953, 50=0.953, 100=0.856, 1000=0.7, 10000=0.545 (USD)", RoHS=Yes, Stock=9943, Supplier=Mouser
J6: "2.54mm Straight 2x7P 7 Horn buckle 2.54mm 2 Plugin,P=2.54mm IDC Connectors ROHS", LCSC Part Number=C9037, Manufacturer=BOOMELE, Package=Plugin,P=2.54mm, ComponentLink1Description=LCSC, ComponentLink1URL=https://www.lcsc.com/product-detail/IDC-Connectors_BOOMELE-Boom-Precision-Elec-2-54-2-7P_C9037.html, Item Type="IDC Connectors", Manufacturer Part Number=2.54-2*7P
J7: "CONN HEADER R/A 4POS 2.54MM", LCSC Part Number=C98739, Manufacturer=Molex, Supplier Part Number=538-22-05-3041, ComponentLink1Description=https://www.molex.com/pdm_docs/sd/022053041_sd.pdf?src-supplier=Digikey, ComponentLink1URL=https://www.molex.com/pdm_docs/sd/022053041_sd.pdf?src-supplier=Digikey, Item Type="Wire To Board Connector", Manufacturer Part Number=0022053041, Pricing="1=0.53, 10=0.383, 50=0.383, 100=0.327, 1000=0.273, 10000=0.266 (USD)", RoHS=Yes, Stock=11241, Supplier=Mouser
J8 J12: "Right-Angle 2.5mm 6mm 10P 2.54mm 双排 2x5P Plugin,P=2.54mm Pin Headers ROHS", LCSC Part Number=C5383090, Manufacturer=HanElectricity, Package=Plugin,P=2.54mm, ComponentLink1Description=LCSC, ComponentLink1URL=https://www.lcsc.com/product-detail/Pin-Headers_HanElectricity-2541WR-2x05P_C5383090.html, Item Type="Pin Header", Manufacturer Part Number=2541WR-2x05P
J9: "CONN HEADER R/A 10POS 4.2MM", LCSC Part Number=C504987, Manufacturer=Molex, Supplier Part Number=538-39-30-1100, ComponentLink1Description=http://components.arrow.com/part/dataview/4710462S3155547N3303?src-supplier=Arrow+Electronics, ComponentLink1URL=http://components.arrow.com/part/dataview/4710462S3155547N3303?src-supplier=Arrow+Electronics, ComponentLink2Description=https://datasheet.octopart.com/39-30-1100-Molex-datasheet-143353.pdf?src-supplier=Digikey, ComponentLink2URL=https://datasheet.octopart.com/39-30-1100-Molex-datasheet-143353.pdf?src-supplier=Digikey, ComponentLink3Description=http://www.molex.com/webdocs/datasheets/pdf/en-us/0039301100_PCB_HEADERS.pdf?src-supplier=Avnet, ComponentLink3URL=http://www.molex.com/webdocs/datasheets/pdf/en-us/0039301100_PCB_HEADERS.pdf?src-supplier=Avnet, Item Type="Wire To Board Connector", Manufacturer Part Number=0039301100, Pricing="1=1.3, 10=1.06, 50=1.06, 100=0.929, 1000=0.864, 10000=0.724 (USD)", RoHS=Yes, Stock=6491, Supplier=Mouser
J11: "9P Female D-Sub Right-Angle 2 3A -50℃~+105℃ Push-Pull D-Sub / VGA connector ROHS", LCSC Part Number=C141882, Manufacturer=Ckmtw, Package=Push-Pull, ComponentLink1Description=LCSC, ComponentLink1URL=https://www.lcsc.com/product-detail/D-Sub-VGA-connector_Ckmtw-Shenzhen-Cankemeng-D-DMR009PF-D002_C141882.html, Item Type="VGA connector", Manufacturer Part Number=D-DMR009PF-D002
J13: library part "14P Through Hole Pads", "Wire Connecting Pads", Item Type="Through Hole Pads", Manufacturer Part Number="14P Through Hole Pads"